# Altium PCB sheet4.PcbDoc (part 3 of 3)
Units mm, origin at the board's own origin, x right, y up, seen from the top; angles counter-clockwise.
Board outline 48.25 x 36 mm, 2 copper layers (Top Layer, Bottom Layer); 112 components, 103 nets, 475 pads, 0 vias.
Unrouted connection lines stored in the file: 312.
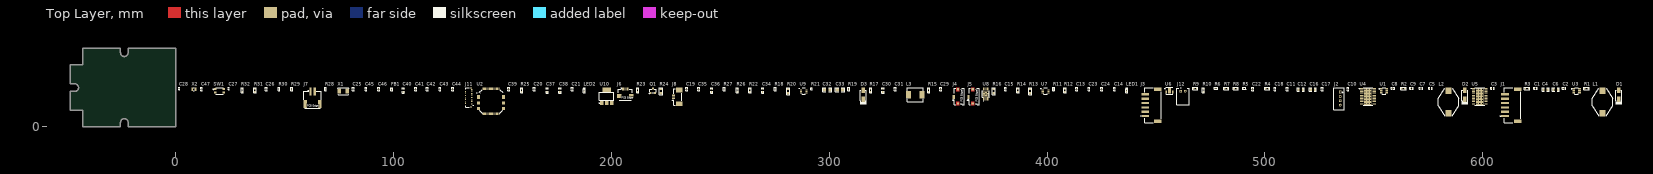
[diagram p0: Top Layer view]

## Part data (continued)
X1: library part ABM3-8.000MHZ-D2Y-T, "5032 2-SMD 8MHz 18pF ±20ppm -40°C~85°C", Case/Package=SMD/SMT, ESR (Equivalent Series Resistance)=140R, Frequency Stability=30ppm, Frequency Tolerance=20ppm, LCSC Part Number=C144380, Load Capacitance=18pF, Manufacturer=Abracon, Max Operating Temperature=85°C, Min Operating Temperature=-40°C, Package Quantity=1000, Resistor Type=Ceramic, Supplier Part Number 1=9005104, Category=Crystals, ComponentLink1Description=https://datasheet.ciiva.com/862/abm3-862465.pdf?src-supplier=Digi-Key, ComponentLink1URL=https://datasheet.ciiva.com/862/abm3-862465.pdf?src-supplier=Digi-Key, Depth=3.2mm, ESR=500R, Frequency=8MHz, Height=0.051inch, Item Type=Crystal, Lead Free="Lead Free", Length=5mm, Manufacturer Part Number=ABM3-8.000MHZ-D2Y-T, Mounting Technology="Surface Mount", Packaging="Cut Tape", Pins=2, Pricing 1="1000=0.36500, 2000=0.35500, 3000=0.35000, 4000=0.34500, 5000=0.33500 (USD)", Radiation Hardening=No, RoHS=Yes, RoHS Compliant=Yes, Series=ABM3, Stock 1=294000, Supplier 1="Future Electronics", Termination=SMD/SMT, Tolerance=20ppm, Width=3.2mm
X2: library part CM8V-T1A-32.768KHZ-6PF-20PPM-TA-QC, "Crystal 32.768KHZ 6.0PF SMD", Manufacturer="Micro Crystal", Supplier Part Number 1=2195-CM8V-T1A-32.768KHZ-6PF-20PPM-TA-QCCT-ND, Manufacturer Part Number=CM8V-T1A-32.768KHZ-6PF-20PPM-TA-QC, Pricing 1="1=0.68000, 10=0.56400, 50=0.50740, 100=0.45100, 500=0.42844 (USD)", RoHS=No, Stock 1=21000, Supplier 1=Digi-Key

## Nets (pads, with @x,y where several pads share a name; then routed paths per layer and width w, separated by ;. In a path a pad name is that pad's centre, name@x,y a point inside that pad or via, vN(x,y) a via of type N, cw(c..) or ccw(c..) an arc to the next point about the centre after c; other vN are vias at no path point)
5VCHG: C13.2 C23.2 LED1.1 U6.1 U6.2
+3V3: C21.2 C38.2 C39.2 C40.2 C41.2 C42.2 C43.2 C44.2 FB1.1 J6.3 J11.2 J11.4 J11.5 R5.2 R6.2 R25.1 R29.2 R30.2 U2.1 U2.19 U2.32 U2.48 U2.64 U10.2 U10.4
+3VDDA: C45.2 C46.2 FB1.2 U2.13
+5V: C20.2 C32.2 C33.2 C37.2 J1.5 J2.1 J3.5 J4.1 J5.1 L3.2 R18.2 R19.2 U7.4 U7.8 U9.4 U9.8 U10.3
+12V1: C2.2 C6.2 C8.2 C18.2 D1.1 R1.2 U4.13 U4.20
+12V2: C3.2 C7.2 C16.2 C17.2 D2.1 R2.2 U5.13 U5.20
/CS: J11.7 U2.9
/RD: J11.11 U2.8
/WR: J11.10 U2.11
BOOT0: R29.1 R31.2 U2.60
BOOT1: R30.1 R32.2 U2.28
BUT1: J6.6 U2.2
BUT2: J6.2 U2.35
BUZZ: R23.1 U2.38
DB0: J11.20 U2.23
DB1: J11.19 U2.22
DB2: J11.18 U2.21
DB3: J11.17 U2.20
DB4: J11.16 U2.17
DB5: J11.15 U2.16
DB6: J11.14 U2.15
DB7: J11.13 U2.14
EN1: U2.53 U4.7
EN2: U2.52 U5.7
FAULT1: R6.1 U2.37 U4.2
FAULT2: R5.1 U2.40 U5.2
FMARK: J11.6 U2.30
GND: C1.1 C2.1 C3.1 C4.1 C5.2 C6.1 C8.1 C10.2 C11.1 C12.1 C13.1 C14.1 C16.1 C17.1 C20.1 C21.1 C23.1 C24.1 C25.2 C26.2 C27.1 C28.1 C30.1 C31.1 C32.1 C33.1 C34.1 C35.1 C36.1 C37.1 C38.1 C39.1 C40.1 C41.1 C42.1 C43.1 C44.1 C45.1 C46.1 C47.1 D3.2 J1.2 J2.4 J3.2 J4.5 J5.5 J6.4 J6.MP1 J6.MP2 J8.MP1 J8.MP2 J11.1 J11.3 J11.12 J11.21 J12.2 LED2.2 Q1.2 R3.1 R4.1 R7.1 R8.1 R9.1 R10.1 R12.1 R17.1 R26.1 R27.1 R31.1 R32.1 SW1.2 U1.2 U2.12 U2.18 U2.31 U2.47 U2.63 U3.2 U4.9 U4.16 U4.17 U4.24 U4.25 U5.9 U5.16 U5.17 U5.24 U5.25 U6.8 U6.9 U6.11 U7.3 U7.7 U8.9 U8.11 U9.3 U9.7 U10.1
hall1: J1.3 U2.42
hall2: J1.4 U2.43
hall5: J3.3 U2.41
hall6: J3.4 U2.39
INT_301021: J4.4 U2.29
INT_301022: J5.4 U2.62
LED1: J6.5 U2.36
LED2: J6.1 U2.34
MEAS1: J3.6 R14.1 R16.1
MEAS2: J1.6 R22.1 R24.1
nCS1: U2.61 U4.6
nCS2: U2.50 U5.6
NetC5_1: C5.1 U5.1
NetC7_1: C7.1 U5.21
NetC9_1: C9.1 U5.23
NetC9_2: C9.2 U5.22
NetC10_1: C10.1 U4.1
NetC15_1: C15.1 R16.2 U7.2
NetC15_2: C15.2 R13.2 U7.1
NetC18_1: C18.1 U4.21
NetC19_1: C19.1 R24.2 U9.2
NetC19_2: C19.2 R20.2 U9.1
NetC22_1: C22.1 U4.23
NetC22_2: C22.2 U4.22
NetC25_1: C25.1 U2.5 X1.2
NetC26_1: C26.1 R28.2 X1.1
NetC27_2: C27.2 U2.3 X2.2
NetC28_2: C28.2 U2.4 X2.1
NetC29_1: C29.1 D3.1 L3.1 U8.10
NetC29_2: C29.2 U8.1
NetC34_2: C34.2 R21.2 U8.8
NetC35_2: C35.2 R21.1
NetC36_2: C36.2 U8.4
NetC47_2: C47.2 SW1.1 U2.7
NetD1_2: D1.2 L1.2 U3.1
NetD2_2: D2.2 L2.2 U1.1
NetJ8_1: J8.1 R18.1
NetJ8_2: J8.2 Q1.3
NetLED1_2: LED1.2 R11.1
NetLED2_1: LED2.1 R25.2
NetQ1_1: Q1.1 R23.2
NetR1_1: R1.1 R3.2 U3.3
NetR2_1: R2.1 R4.2 U1.3
NetR7_2: R7.2 U5.12
NetR8_2: R8.2 U5.10
NetR9_2: R9.2 U4.12
NetR10_2: R10.2 U4.10
NetR11_2: R11.2 U6.7
NetR12_2: R12.2 U6.10
NetR15_1: R15.1 R17.2 U8.3
NetR19_1: R19.1 R27.2 U8.7
NetR26_2: R26.2 U8.5
NetR28_1: R28.1 U2.6
PH1: U2.51 U4.8
PH2: U2.54 U5.8
PWM1: J1.1 U4.18 U4.19
PWM2: R20.1 R22.2 U4.14 U4.15
PWM3: J3.1 U5.18 U5.19
PWM4: R13.1 R14.2 U5.14 U5.15
RESET: J11.8 U2.33
RS: J11.9 U2.10
SCL_M: J4.2 J5.2 U2.58 U7.5 U9.5
SCLK: U2.55 U4.5 U5.5
SDA_M: J4.3 J5.3 U2.59 U7.6 U9.6
SDI: U2.57 U4.4 U5.4
SDO: U2.56 U4.3 U5.3
SLEEP1: U2.46 U4.11
SLEEP2: U2.49 U5.11
USB_D_N: J2.2 U2.44
USB_D_P: J2.3 U2.45
VBAT: C1.2 C4.2 C11.2 C12.2 C14.2 C24.2 C30.2 C31.2 J12.1 L1.1 L2.1 R15.2 U1.4 U1.5 U3.4 U3.5 U6.3 U6.4 U8.2
XL: J11.24 U2.25
XR: J11.22 U2.24
YD: J11.23 U2.26
YU: J11.25 U2.27
pads on no net: J1.MP1 J1.MP2 J3.MP1 J3.MP2 J4.MP1 J4.MP2 J5.MP1 J5.MP2 J7.1 J7.2 J7.MP1 J7.MP2 J11.MP1 J11.MP2 U1.6 U3.6 U4.P1 U4.P2 U4.P3 U4.P4 U4.P5 U4.P6 U4.P7 U4.P8 U4.P9 U4.P10 U4.P11 U4.P12 U4.P13 U4.P14 U4.P15 U4.P16 U4.P17 U4.P18 U5.P1 U5.P2 U5.P3 U5.P4 U5.P5 U5.P6 U5.P7 U5.P8 U5.P9 U5.P10 U5.P11 U5.P12 U5.P13 U5.P14 U5.P15 U5.P16 U5.P17 U5.P18 U6.5 U6.6 U8.6

## Text inside footprints (layer, text, board x,y; h text height)
J4: Top Overlay "PCB Edge" at 361.485,11.506 h1.2 r90
J5: Top Overlay "PCB Edge" at 368.343,11.506 h1.2 r90
J6: Top Overlay "PCB Edge" at 204.765,12.571 h0.8
J7: Top Overlay "PCB Edge" at 60.466,8.963 h1.2